# Altium PCB 24V-70A-Power-Board-v2.0.PcbDoc (part 8 of 9)
Units mm, origin at the board's own origin, x right, y up, seen from the top; angles counter-clockwise.
Board outline 350 x 215 mm, 2 copper layers (Top Layer, Bottom Layer), stack 1.64 mm thick; 337 components, 182 nets, 856 pads, 561 vias.
Unrouted connection lines stored in the file: 58.
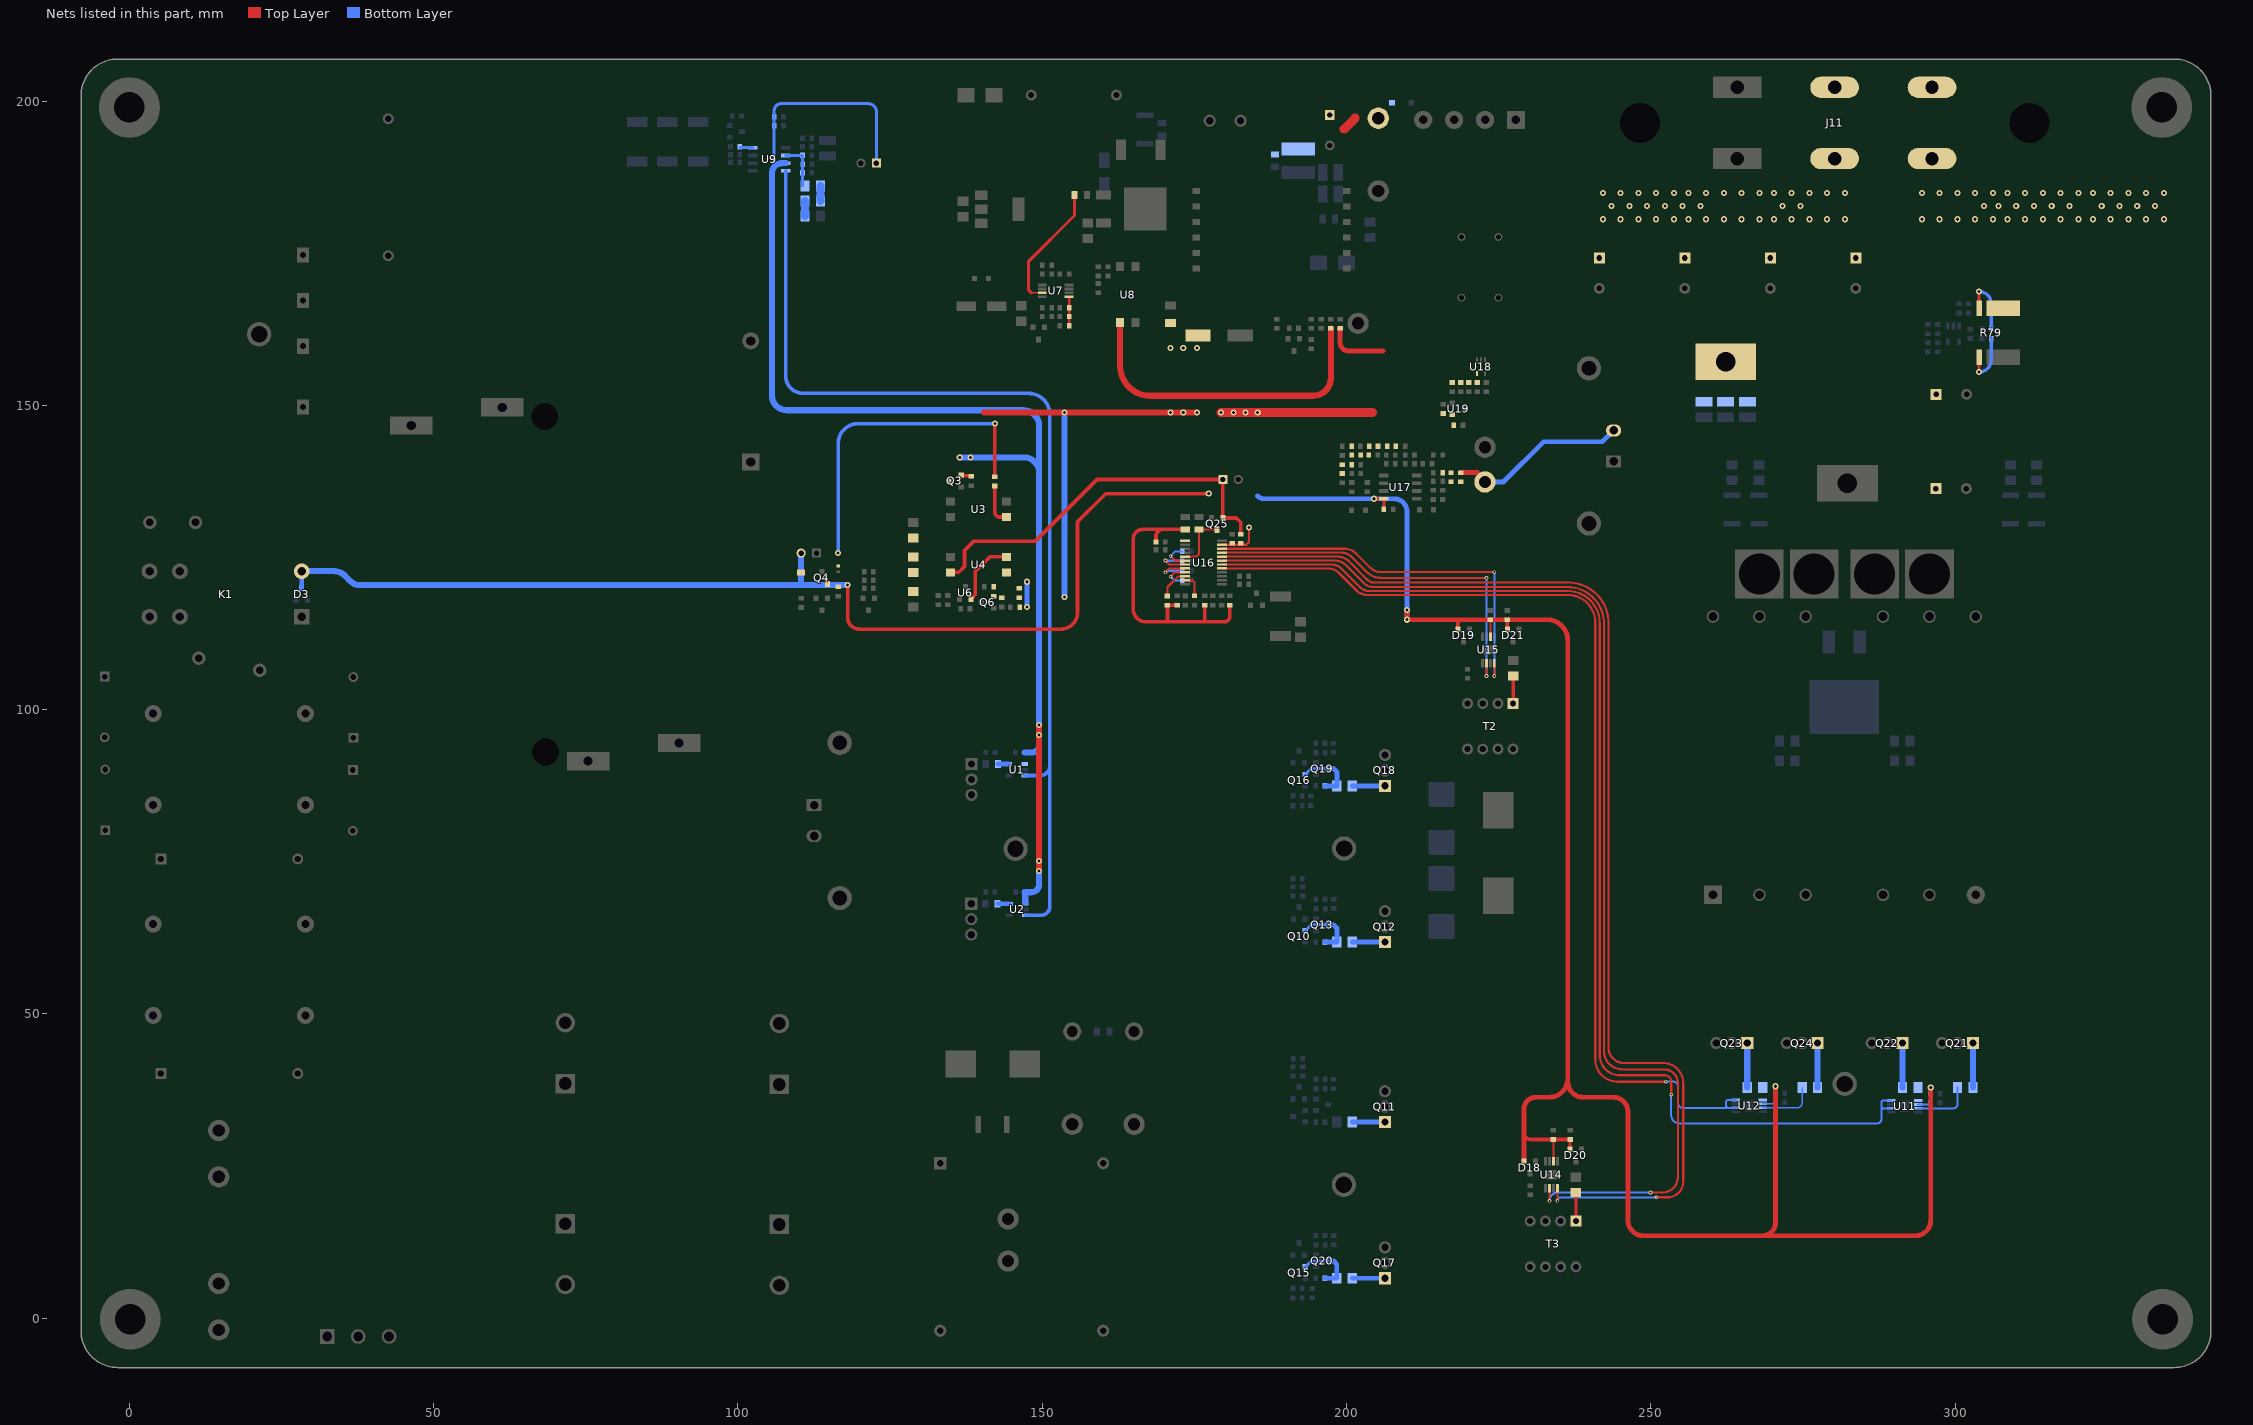
[diagram p3: the nets of this part, all layers, seen from the top]

## Via types
v1: diameter 1, hole 0.5, Top Layer to Bottom Layer, 506 vias
v2: diameter 0.6, hole 0.3, Top Layer to Bottom Layer, 35 vias
v3: diameter 1, hole 0.5, Top Layer to Bottom Layer, tented both sides, 16 vias
v4: diameter 0.6, hole 0.3, Top Layer to Bottom Layer, tented both sides, 4 vias

## Nets (pads, with @x,y where several pads share a name; then routed paths per layer and width w, separated by ;. In a path a pad name is that pad's centre, name@x,y a point inside that pad or via, vN(x,y) a via of type N, cw(c..) or ccw(c..) an arc to the next point about the centre after c; other vN are vias at no path point) (continued)
NetQ10_1: Q10.1 Q13.3 R52.2 R53.1 | length 10.1
  Bottom Layer w0.5: Q10.1@193.218,63.719 193.268,63.719 194.218,64.669 Q13.3@196.996,64.669
  Bottom Layer w0.8: R52.2@196.481,61.819 R53.1@198.425,61.819 198.425,64.11 197.875,64.659 197.006,64.659 Q13.3@196.996,64.669
NetQ11_1: Q11.1 R54.2 | length 5.4
  Bottom Layer w0.8: R54.2@200.951,32.237 Q11.1@206.318,32.237
NetQ12_1: Q12.1 R53.2 | length 5.4
  Bottom Layer w0.8: R53.2@200.965,61.819 Q12.1@206.331,61.819
NetQ15_1: Q15.1 Q20.3 R64.1 R65.2 | length 10.1
  Bottom Layer w0.5: Q15.1@193.204,8.468 193.254,8.468 194.204,9.418 Q20.3@196.982,9.418
  Bottom Layer w0.8: R65.2@196.468,6.568 198.411,6.568 198.411,8.858 197.862,9.408 196.992,9.408 Q20.3@196.982,9.418
NetQ16_1: Q16.1 Q19.3 R62.2 R63.1 | length 10.1
  Bottom Layer w0.5: Q16.1@193.218,89.388 193.268,89.388 194.218,90.338 Q19.3@196.996,90.338
  Bottom Layer w0.8: R62.2@196.481,87.488 R63.1@198.425,87.488 198.425,89.779 197.875,90.328 197.006,90.328 Q19.3@196.996,90.338
NetQ17_1: Q17.1 R64.2 | length 5.4
  Bottom Layer w0.8: R64.2@200.951,6.568 Q17.1@206.318,6.568
NetQ18_1: Q18.1 R63.2 | length 5.4
  Bottom Layer w0.8: R63.2@200.965,87.488 Q18.1@206.331,87.488
NetQ21_1: Q21.1 R73.2 | length 7.3
  Bottom Layer w1.016: R73.2@302.941,37.916 Q21.1@302.941,45.231
NetQ22_1: Q22.1 R75.2 | length 7.3
  Bottom Layer w1.016: R75.2@291.384,37.916 Q22.1@291.384,45.231
NetQ23_1: Q23.1 R76.2 | length 7.3
  Bottom Layer w1.016: R76.2@265.857,37.916 Q23.1@265.857,45.231
NetQ24_1: Q24.1 R74.1 | length 7.3
  Bottom Layer w1.016: R74.1@277.414,37.916 Q24.1@277.414,45.231
NetR1_1: R1.1 U1.5 | length 1.8
  Bottom Layer w0.76: R1.1@142.743,91.088 U1.5@144.515,91.088
NetR2_1: R2.1 U2.5 | length 1.9
  Bottom Layer w0.76: R2.1@142.669,68.126 U2.5@144.617,68.126
NetR10_1: R10.1 R16.1 U4.1 | length 4.2
  Bottom Layer w0.8: v1(147.523,116.871) v1(147.523,121.031)
NetR15_1: R15.1 R18.2
NetR17_1: R17.1 U3.1 | length 6.7
  Top Layer w0.6: R17.1@142.227,136.762 142.227,132.41 ccw(c142.971,132.41) 142.971,131.666 U3.1@144.153,131.666
NetR18_1: R18.1 R20.2
NetR26_2: R26.2 R27.1 | length 2.5
  Bottom Layer w1.27: R27.1@113.563,183.591 R26.2@113.563,186.049
NetR27_2: R27.2 R28.1 | length 2.5
  Bottom Layer w1.27: R28.1@111.023,181.133 R27.2@111.023,183.591
NetR37_1: R37.1 U9.4 | length 2.1
  Bottom Layer w0.508: R37.1@100.311,192.354 U9.4@102.456,192.354
NetR38_1: R38.1 U8.1 | length 54.3
  Top Layer w1: U8.1@162.794,163.603 162.794,156.544 ccw(c167.749,156.544) 167.749,151.589 194.51,151.589 ccw(c194.51,154.513) 197.434,154.513 R38.1@197.434,162.662
NetR41_1: R41.1 U7.7 | length 21.2
  Top Layer w0.3: 148.209,168.504 U7.7@150.023,168.504
  Top Layer w0.5: 148.209,168.504 147.768,168.945 147.768,173.675 155.321,181.228 R41.1@155.321,184.576
NetR56_2: R56.2 T2.1 | length 4.5
  Top Layer w0.6: T2.1@227.392,101.023 R56.2@227.392,105.537
NetR59_2: R59.2 T3.1 | length 4.7
  Top Layer w0.508: T3.1@237.689,15.958 R59.2@237.689,20.65
NetR73_1: R73.1 U11.7 | length 9.6
  Bottom Layer w0.33: U11.7@293.924,34.491 299.751,34.491 ccw(c299.751,35.141) 300.401,35.141 R73.1@300.401,37.916
NetR74_2: R74.2 U12.7 | length 9.5
  Bottom Layer w0.254: U12.7@268.397,34.584 274.043,34.584 ccw(c274.043,35.415) 274.874,35.415 R74.2@274.874,37.916
NetR75_1: R75.1 U11.5
NetR76_1: R76.1 U12.5
NetR78_1: R78.1 R79.1 | length 10
  Top Layer w0.559: R79.1@303.946,165.962 v3@303.946,168.711
  Bottom Layer w0.559: v3(303.944,168.714) cw(c303.944,166.695) 305.962,166.695 R78.1@305.962,162.645
NetR79_3: R79.3 R80.1 | length 9
  Top Layer w0.559: v3(303.949,155.506) R79.3@303.949,157.91
  Bottom Layer w0.559: v3(303.949,155.506) ccw(c303.949,157.522) 305.965,157.522 R80.1@305.965,160.99
NetR90_2: R90.2 R91.1
NetR91_2: R91.2 R92.1
NetR93_2: R93.2 U16.6 | length 4.9
  Top Layer w0.35: v2(171.1,125.226) 171.813,124.513 U16.6@173.491,124.513
  Bottom Layer w0.35: v2(171.1,125.226) 171.886,126.013 R93.2@172.993,126.013
NetR94_2: R94.2 U16.7 | length 6.3
  Top Layer w0.35: v2(170.252,124.513) 170.902,123.863 U16.7@173.491,123.863
  Bottom Layer w0.35: v2(170.252,124.513) 170.294,124.471 172.952,124.471 R94.2@172.993,124.429
NetR95_2: R95.2 U16.8 | length 6.4
  Top Layer w0.35: v2(170.252,122.563) 170.902,123.213 U16.8@173.491,123.213
  Bottom Layer w0.35: v2(170.252,122.563) 170.299,122.563 170.582,122.846 R95.2@173.016,122.846
NetR97_2: R97.2 U16.9 | length 4.8
  Top Layer w0.35: v2(171.104,121.857) 171.81,122.563 U16.9@173.491,122.563
  Bottom Layer w0.35: v2(171.104,121.857) 171.697,121.263 R97.2@173.016,121.263
NetR104_2: R104.2 U16.10 | length 5.1
  Top Layer w0.35: R104.2@170.582,118.697 170.582,120.161 172.333,121.913 U16.10@173.491,121.913
NetR105_2: R105.2 U16.11 | length 3.9
  Top Layer w0.35: U16.11@173.491,121.263 174.686,121.263 175.023,120.925 R105.2@175.023,118.699
NetR106_1: R106.1 R108.2
NetR106_2: R106.2 R107.1
NetR111_2: R111.2 R112.1 R113.1
NetR114_1: R114.1 R119.1 U19.2
NetR116_1: R116.1 R117.2
NetR116_2: R116.2 R118.1
NetU4_2: U4.2 U6.2 | length 11
  Top Layer w0.6: U6.2@138.316,118.185 138.316,118.235 138.426,118.345 138.476,118.345 139.012,118.881 139.012,122.725 141.399,125.113 U4.2@144.153,125.113
OUT-A: U15.4 U16.22 | length 65.3
  Top Layer w0.32: v2(224.303,105.537) U15.4@224.303,107.619
  Top Layer w0.36: U16.22@179.536,126.463 199.731,126.463 cw(c199.731,123.923) 201.527,125.719 203.895,123.351 ccw(c205.691,125.147) 205.691,122.607 v2(224.303,122.607)
  Bottom Layer w0.36: v2(224.303,105.537) v2(224.303,122.607)
OUT-B: U15.2 U16.21 | length 63.1
  Top Layer w0.32: v2(223.003,105.537) U15.2@223.003,107.619
  Top Layer w0.36: U16.21@179.536,125.813 199.104,125.813 cw(c199.104,123.273) 200.9,125.069 203.326,122.643 203.328,122.641 ccw(c205.687,125.001) 205.687,121.664 205.688,121.664 v2(223.003,121.664)
  Bottom Layer w0.36: v2(223.003,105.537) v2(223.003,121.664)
OUT-C: U14.4 U16.20 | length 195.1
  Top Layer w0.32: v2(234.661,19.285) U14.4@234.661,21.368
  Top Layer w0.36: U16.20@179.536,125.163 198.564,125.163 cw(c198.564,122.623) 200.36,124.419 200.931,123.848 202.852,121.927 203.368,121.41 ccw(c204.615,122.657) 204.615,120.894 205.345,120.894 236.443,120.894 cw(c236.443,114.281) 243.056,114.281 243.056,44.475 ccw(c245.596,44.475) 245.596,41.935 252.071,41.935 cw(c252.071,38.676) 255.33,38.676 255.33,22.421 cw(c252.79,22.421) 252.79,19.881 v2(250.915,19.881)
  Bottom Layer w0.32: v2(234.661,19.285) cw(c235.257,19.285) 235.257,19.881 v2(250.915,19.881)
OUT-D: U14.2 U16.19 | length 194
  Top Layer w0.32: v2(233.361,19.285) U14.2@233.361,21.368
  Top Layer w0.36: U16.19@179.536,124.513 198.067,124.513 cw(c198.067,121.973) 198.572,124.462 cw(c198.499,124.109) 198.575,124.461 cw(c197.757,120.674) 198.739,124.422 cw(c198.067,121.973) 199.863,123.769 202.735,120.896 ccw(c204.531,122.693) 204.531,120.153 236.351,120.153 cw(c236.351,114.19) 242.314,114.19 242.314,43.919 ccw(c245.339,43.919) 245.339,40.894 252.206,40.894 cw(c252.206,38.643) 254.457,38.643 254.457,23.216 cw(c251.917,23.216) 251.917,20.676 v2(249.961,20.676)
  Bottom Layer w0.36: v2(233.361,19.285) cw(c234.752,19.285) 234.752,20.676 v2(249.961,20.676)
OUT-E: U11.2 U11.4 U16.18 | length 199.8
  Top Layer w0.36: U16.18@179.536,123.863 197.452,123.863 cw(c197.452,121.323) 199.248,123.119 202.194,120.173 202.195,120.172 ccw(c203.81,121.787) 203.81,119.503 203.812,119.503 236.352,119.503 cw(c236.352,114.236) 241.619,114.236 241.619,43.239 ccw(c244.929,43.239) 244.929,39.929 252.397,39.929 cw(c252.397,38.961) 253.365,38.961 v2(253.365,36.754)
  Bottom Layer w0.33: v2(253.365,36.754) 253.365,33.351 ccw(c254.671,33.351) 254.671,32.045 287.298,32.045 ccw(c287.298,32.644) 287.897,32.644 287.897,35.134 ; U11.2@289.524,34.493 U11.2@289.524,34.491 288.274,34.491 cw(c288.274,34.868) 287.897,34.868 287.897,35.134 ; U11.4@289.524,35.791 288.288,35.791 ccw(c288.288,35.4) 287.897,35.4 287.897,35.134
OUT-F: U12.2 U12.4 U16.17 | length 169.4
  Top Layer w0.36: U16.17@179.536,123.213 196.981,123.213 cw(c196.981,120.673) 198.777,122.469 201.65,119.597 ccw(c203.446,121.393) 203.446,118.853 236.352,118.853 cw(c236.352,114.321) 240.883,114.321 240.883,42.534 ccw(c244.536,42.534) 244.536,38.881 v2(252.476,38.881)
  Bottom Layer w0.33: v2(252.476,38.881) 253.746,38.881 cw(c253.746,38.17) 254.457,38.17 254.457,35.414 ccw(c255.287,35.414) 255.287,34.584 U12.2@263.997,34.584 ; 262.458,34.719 ccw(c262.747,34.961) 262.747,34.584 cw(c262.747,34.961) 262.37,34.961 262.37,35.493 cw(c262.762,35.493) 262.762,35.884 U12.4@263.997,35.884
PFC_GATE_DRV: U1.3 U2.3 U9.8 | length 171.5
  Bottom Layer w0.6: U9.8@107.856,188.544 107.856,154.868 ccw(c110.744,154.868) 110.744,151.98 147.764,151.98 cw(c147.764,148.487) 151.257,148.487 151.257,90.788 ; U1.3@147.115,89.188 149.657,89.188 ccw(c149.657,90.788) 151.257,90.788 ; U2.3@147.217,66.226 149.809,66.226 ccw(c149.809,67.674) 151.257,67.674 151.257,90.788
PFC_ON: NT1.1 R17.2 | length 54.4
  Top Layer w0.6: R17.2@142.227,138.286 v3(142.227,147.012)
  Bottom Layer w0.6: v1(116.478,125.73) 116.478,143.736 cw(c119.754,143.736) 119.754,147.012 v3(142.227,147.012)
PG_PFC: J12.1 Q25.1 R83.1 U4.4 | length 64.1
  Top Layer w0.6: U4.4@134.953,122.573 136.289,122.573 137.243,123.527 137.243,126.168 138.785,127.711 148.89,127.711 159.01,137.83 J12.1@179.688,137.83 Q25.1@179.688,131.527 179.7,131.515 181.895,131.515 182.61,130.801 R83.1@182.61,128.854
QR: C31.2 R33.1 R44.2 U7.1 | length 4.9
  Top Layer w0.4: R44.2@154.32,164.474 R44.2@154.423,164.578 ; R33.1@154.423,163.119 R44.2@154.423,164.578 ; U7.1@154.423,167.781 C31.2@154.423,166.048 R44.2@154.423,164.615 R44.2@154.423,164.578 ; R44.2@154.46,164.615 R44.2@154.423,164.578
SS/EN: C91.2 Q25.3 U16.5 | length 9.5
  Top Layer w0.35: U16.5@173.491,125.163 175.102,125.163 ccw(c175.102,125.813) 175.752,125.813 C91.2@175.752,129.638 178.627,129.638 Q25.3@178.738,129.527
V_out: C58.2 C59.2 C60.2 C61.1 C62.1 C63.1 C64.1 C65.1 C66.1 J11.2 J13.1 L9.2 R68.2 R92.2 | length 28.8
  Top Layer w0.8: R92.2@218.811,138.958 221.506,138.958 222.027,138.437 J13.1@222.758,138.437
  Bottom Layer w0.8: J13.1@222.758,137.421 225.788,137.421 232.398,144.031 242.038,144.031 R68.2@243.897,145.89
  other v1: 242.123,180.598 245.04,180.598 247.956,180.598 250.873,180.598 253.79,180.598 256.173,180.598 259.09,180.598 262.007,180.598 264.923,180.598 267.84,180.598 270.223,180.598 273.14,180.598 276.057,180.598 278.973,180.598 281.89,180.598 243.582,182.753 246.498,182.753 249.415,182.753 252.331,182.753 255.248,182.753 258.165,182.753 271.682,182.753 274.598,182.753 242.123,184.908 245.04,184.908 247.956,184.908 250.873,184.908 253.79,184.908 256.173,184.908 259.09,184.908 262.007,184.908 264.923,184.908 267.84,184.908 270.223,184.908 273.14,184.908 276.057,184.908 278.973,184.908 281.89,184.908
V_out-: J11.3 R79.2
  other v1: 294.55,180.598 297.466,180.598 300.383,180.598 303.299,180.598 306.216,180.598 308.6,180.598 311.516,180.598 314.433,180.598 317.349,180.598 320.266,180.598 322.65,180.598 325.566,180.598 328.483,180.598 331.399,180.598 334.316,180.598 304.758,182.753 307.141,182.753 310.058,182.753 312.974,182.753 315.891,182.753 318.808,182.753 324.108,182.753 327.025,182.753 329.941,182.753 332.858,182.753 294.55,184.908 297.466,184.908 300.383,184.908 303.299,184.908 306.216,184.908 308.6,184.908 311.516,184.908 314.433,184.908 317.349,184.908 320.266,184.908 322.65,184.908 325.566,184.908 328.483,184.908 331.399,184.908 334.316,184.908
VCC_FB: C18.1 C67.2 C68.2 C69.2 C70.2 C80.2 C81.2 C82.2 C83.2 C89.2 C92.2 C99.2 C100.2 C101.2 D3.3 D18.2 D19.2 D20.2 D21.2 D25.1 J6.2 J7.1 K1.6 L5.2 Q4.2 R13.2 R14.2 R29.2 R31.2 R83.2 R115.2 U11.6 U12.6 U14.6 U15.6 U16.23 U17.8 U18.4 | length 554.5
  Top Layer w0.3: U15.6@223.653,112.019 C82.2@223.653,114.789
  Top Layer w0.33: U14.6@234.011,25.768 C81.2@234.011,29.378
  Top Layer w0.35: U16.23@179.536,127.113 183.524,127.113 183.972,127.561 v1(183.972,129.921)
  Top Layer w0.5: v1@204.53,134.671 U17.8@206.139,134.671 ; C92.2@206.152,132.944 U17.8@206.152,134.671
  Top Layer w0.508: D20.2@236.739,27.768 C80.2@236.739,29.378
  Top Layer w0.6: v1(118.035,120.464) 118.034,115.166 ccw(c119.953,115.166) 119.953,113.247 153.073,113.247 ccw(c153.073,115.977) 155.804,115.977 155.804,130.885 160.428,135.509 v1(177.368,135.509) ; D19.2@218.314,113.216 218.314,114.123 cw(c218.979,114.123) 218.979,114.789 ; D21.2@226.442,113.216 C83.2@226.442,114.789 ; 229.176,30.521 ccw(c230.319,30.521) 230.319,29.378 C81.2@234.011,29.378 C80.2@236.739,29.378
  Top Layer w0.8: R31.2@198.958,162.658 198.958,160.337 ccw(c200.342,160.337) 200.342,158.953 206.049,158.953 ; v1(209.931,116.418) v1(209.931,114.789) 218.979,114.789 C82.2@223.653,114.789 C83.2@226.442,114.789 232.98,114.789 cw(c232.98,111.41) 236.359,111.41 236.359,38.862 ccw(c238.899,38.862) 238.899,36.322 243.84,36.322 cw(c243.84,33.909) 246.253,33.909 246.253,16.104 ccw(c248.793,16.104) 248.793,13.564 268.376,13.564 ; D18.2@229.176,25.768 229.176,30.521 229.176,34.383 cw(c231.115,34.383) 231.115,36.322 233.327,36.322 ccw(c233.327,39.354) 236.32,38.868 ; v3(270.502,38.125) 270.487,38.11 270.487,15.674 cw(c268.376,15.674) 268.376,13.564 ; v3(296.014,37.916) 296.014,16.104 cw(c293.474,16.104) 293.474,13.564 268.376,13.564
  Top Layer w1.5: v1(179.4,148.869) v1(181.405,148.869) v1(183.41,148.869) v1(185.414,148.869) 191.821,148.869 196.799,148.869 204.276,148.869 ; 199.634,195.416 201.432,197.214
  Bottom Layer w0.254: U12.6@268.397,35.234 270.374,35.234 ccw(c270.374,35.415) C69.2@270.502,35.287
  Bottom Layer w0.33: U11.6@293.924,35.141 C68.2@295.764,35.141
  Bottom Layer w0.508: C70.2@270.487,36.956 270.495,36.963 270.495,38.118 v3(270.502,38.125) ; C68.2@296.014,35.39 C67.2@296.014,36.863 ; C67.2@296.014,36.863 v3(296.014,37.916)
  Bottom Layer w0.559: C69.2@270.487,35.483 C70.2@270.487,36.956
  Bottom Layer w0.7: D3.3@28.325,119.967 K1.6@28.325,122.721
  Bottom Layer w0.8: 185.395,135.128 ccw(c186.513,136.246) 186.513,134.665 v1(204.524,134.665) 207.829,134.665 cw(c207.829,132.563) 209.931,132.563 v1(209.931,116.418) v1(209.931,114.789)
  Bottom Layer w1: K1.6@28.312,122.764 33.639,122.764 cw(c33.639,120.224) 35.435,122.02 36.322,121.133 ccw(c37.937,122.747) 37.937,120.464 110.373,120.464 ; J6.2@110.373,125.73 110.373,120.464 ; v1(118.035,120.464) 110.373,120.464
VCC_PFC: C34.2 C35.2 C105.2 C106.2 J8.1 Q3.3 U1.1 U2.1 U9.7 | length 225
  Top Layer w1: v3(149.501,73.498) v3(149.501,75.143) v3(149.501,95.842) v3(149.501,97.486)
  Bottom Layer w0.508: 105.954,189.124 105.954,189.193 C34.2@105.954,195.936 C35.2@105.954,197.434 105.954,198.45 cw(c107.097,198.45) 107.097,199.593 121.44,199.593 cw(c121.44,198.272) 122.761,198.272 J8.1@122.761,189.814
  Bottom Layer w1: U9.7@107.856,189.814 107.25,189.814 ccw(c107.25,188.152) 105.954,189.193 ccw(c107.25,188.152) 105.588,188.152 105.588,151.672 ccw(c108.052,151.672) 108.052,149.208 146.901,149.208 cw(c146.901,146.608) 149.501,146.608 149.501,138.938 ; v1(136.449,141.478) v1(138.196,141.478) 146.961,141.478 cw(c146.961,138.938) 149.501,138.938 ; C105.2@147.115,70.006 C105.2@147.217,70.006 148.199,70.006 ccw(c148.199,71.308) 149.501,71.308 v3(149.501,73.498) v3(149.501,75.143) ; C106.2@147.115,92.967 148.285,92.967 ccw(c148.285,94.183) 149.501,94.183 v3(149.501,95.842) v3(149.501,97.486) 149.501,138.938 ; U2.1@147.217,68.34 C105.2@147.217,69.904
VCC_Primary: C12.2 C104.1 D7.1 Q3.2 Q6.2 R9.2 R10.2 R11.2 | length 67.1
  Top Layer w0.6: Q3.2@136.667,138.537 136.77,138.434 138.17,138.434 R11.2@138.318,138.286
  Top Layer w1: 140.437,148.869 v3(153.645,148.869) 171.12,148.869 v1(173.177,148.869) v1(175.457,148.869)
  Bottom Layer w1: v3(153.645,118.516) v3(153.645,148.869)
  other v1: 171.102,148.869 171.102,159.436 173.177,159.436 175.457,159.436
VREF: C88.2 R86.1 R87.2 R88.2 R89.2 R104.1 U16.1 | length 50.7
  Top Layer w0.6: 164.973,116.002 164.973,116.481 ; R86.1@168.69,127.563 168.69,128.472 cw(c169.857,128.472) 169.857,129.639 ; R89.2@172.212,117.178 172.209,117.175 170.585,117.175 R104.1@170.582,117.173 170.582,114.452 ; C88.2@173.491,129.639 169.857,129.639 ; R87.2@176.733,117.178 176.733,114.452 ; R88.2@180.848,117.178 180.848,115.367 cw(c179.934,115.367) 179.934,114.452 176.733,114.452 ; 164.973,116.481 ccw(c167.002,116.481) 167.002,114.452 170.582,114.452 ; 164.973,116.481 164.973,128.082 cw(c166.53,128.082) 166.53,129.639 169.857,129.639 ; 170.582,114.452 176.733,114.452
VSENSE: C27.2 R26.1 R34.1 R39.2 U9.6 | length 7.8
  Bottom Layer w0.508: U9.6@107.856,191.084 R39.2@110.617,191.084 110.617,189.669 ccw(c110.642,189.669) C27.2@110.642,189.644 ccw(c110.642,189.618) 110.617,189.618 R34.1@110.617,188.244 R26.1@110.617,186.049
pads on no net: D3.2 D8.2 D10.2 D23.2 Designator111_1.1 Designator111_1_1.1 Designator111_1_3.1 Designator112.1 Designator112.2 J11.S23 J15.1 J15.3 L1.M1 L2.M1 T1.2 T1.5 T1.8 T1.10 T2.2 T2.3 T3.2 T3.3 T4.2 T4.3 T4.4 T4.5 T4.7 T4.8 T4.9 T4.10 T4.11 T4.12 U11.1 U11.8 U12.1 U12.8 U14.1 U14.8 U15.1 U15.8 U16.16 U18.1 U18.3

## Polygon pours and split planes (outlines as drawn)
GND-S on Top Layer "GND-S_L01_P082" (solid, pour order 82): 219.786,195.178 cw(c218.211,195.178) 218.211,193.603 ccw(c218.211,191.926) 216.535,191.926 216.535,158.704 ccw(c219.075,158.704) 219.075,156.164 224.912,156.164 cw(c224.912,155.423) 225.654,155.423 225.654,153.518 cw(c224.888,153.518) 224.888,152.753 218.431,152.753 ccw(c218.431,152.629) 218.306,152.629 218.306,145.058 cw(c217.615,145.058) 217.615,144.366 212.772,144.366 ccw(c212.772,142.358) 210.764,142.358 210.764,138.181 212.909,138.181 212.909,142.358 cw(c213.833,142.358) 213.833,143.282 219.019,143.282 ccw(c219.019,144.561) 220.298,144.561 cw(c221.432,144.561) 221.432,145.694 232.842,145.694 ccw(c232.842,147.117) 234.264,147.117 234.264,198.679 ccw(c231.724,198.679) 231.724,201.219 221.945,201.219 ccw(c221.945,199.06) 219.786,199.06
GND-S on Top Layer "GND-S_L01_P084" (solid, pour order 84): 196.113,193.531 196.113,182.182 ccw(c198.653,182.182) 198.653,179.642 205.372,179.642 ccw(c205.372,181.391) 207.122,181.391 207.122,185.65 ccw(c205.53,185.65) 205.53,187.242 204.426,187.242 cw(c204.426,189.763) 201.905,189.763 201.905,190.991 ccw(c199.365,190.991) 199.365,193.531
VCC_FB on Top Layer "VCC_FB_L01_P063" (solid, pour order 63): 196.113,194.666 196.113,200.127 cw(c197.002,200.127) 197.002,201.016 206.529,201.016 cw(c206.529,198.476) 209.069,198.476 209.069,197.327 209.069,196.24 ccw(c211.609,196.24) 211.609,193.7 212.725,193.7 cw(c212.725,191.16) 215.265,191.16 215.265,156.362 ccw(c215.734,156.362) 215.734,155.894 221.504,155.894 cw(c221.504,155.313) 222.085,155.313 222.085,153.55 cw(c221.926,153.55) 221.926,153.391 209.144,153.391 ccw(c209.144,150.851) 206.604,150.851 206.604,149.216 cw(c204.064,149.216) 204.064,146.676 179.268,146.676 cw(c179.268,147.636) 178.308,147.636 178.308,148.785 cw(c179.308,148.785) 179.308,149.785 197.981,149.785 ccw(c197.981,152.146) 200.342,152.146 200.342,158.953 cw(c201.714,158.953) 201.714,160.325 204.019,160.325 205.396,160.325 ccw(c205.396,162.865) 207.936,162.865 207.936,186.615 ccw(c205.778,186.615) 205.778,188.773 205.232,188.773 cw(c205.232,190.906) 203.098,190.906 203.098,192.557 ccw(c200.99,192.557) 200.99,194.666
NetC41_2 on Top Layer "NETC41_2_L01_P060" (solid, pour order 60): 302.047,10.465 ccw(c302.082,13.005) 304.622,13.005 304.622,23.063 cw(c307.162,23.063) 307.162,25.603 310.49,25.502 318.262,25.502 ccw(c318.262,28.042) 320.802,28.042 320.802,57.277 ccw(c318.262,57.277) 318.262,59.817 304.038,59.817 cw(c304.038,62.357) 301.498,62.357 301.498,74.676 cw(c304.038,74.676) 304.038,77.216 337.058,77.216 cw(c337.058,74.676) 339.598,74.676 339.573,67.056 339.573,11.532 cw(c337.033,11.532) 337.033,8.992 327.279,8.992 ccw(c327.279,6.452) 324.739,6.452 324.739,-4.293 cw(c322.199,-4.293) 322.199,-6.833 212.889,-6.833 cw(c212.889,-4.293) 210.349,-4.293 210.349,10.274 210.349,12.191 ccw(c209.079,12.191) 209.078,13.462 204.863,13.462 ccw(c204.863,12.992) 204.393,12.992 204.393,10.736 ccw(c204.943,10.736) 204.943,10.185 208.698,10.185 cw(c208.698,9.805) 209.078,9.805 209.078,8.401 cw(c208.552,8.401) 208.552,7.874 207.617,7.874 200.228,7.874 cw(c200.228,9.754) 198.349,9.754 198.349,15.03 cw(c200.889,15.03) 200.889,17.57 201.348,17.57 ccw(c201.348,19.462) 203.241,19.462 203.241,23.542 cw(c205.781,23.542) 205.781,26.082 212.53,26.082 ccw(c212.53,27.724) 214.173,27.724 214.173,30.848 214.173,34.569 ccw(c212.623,34.569) 212.623,36.119 203.73,36.119 cw(c203.73,37.317) 202.532,37.317 202.532,42.951 cw(c203.6,42.951) 203.6,44.018 223.952,44.018 cw(c223.952,41.478) 226.492,41.478 226.492,7.214 ccw(c227.497,7.214) 227.497,6.208 233.119,6.208 ccw(c233.119,6.947) 233.858,6.947 233.858,9.728 cw(c234.594,9.728) 234.594,10.465
GND-S on Top Layer "GND-S_L01_P079" (solid, pour order 79): 322.054,160.477 339.853,160.477 cw(c339.853,159.488) 340.843,159.488 340.843,82.601 cw(c338.303,82.601) 338.303,80.061 336.956,80.061 300.431,80.061 ccw(c300.431,77.521) 297.891,77.521 297.891,60.198 ccw(c300.431,60.198) 300.431,57.658 315.417,57.658 cw(c315.417,55.118) 317.957,55.118 317.957,29.743 cw(c316.713,29.743) 316.713,28.499 300.05,28.499 cw(c300.05,31.039) 297.51,31.039 297.51,38.633 ccw(c296.977,38.633) 296.977,39.167 295.58,39.167 ccw(c295.58,38.405) 294.818,38.405 294.818,34.836 294.818,22.708 cw(c292.278,22.708) 292.278,20.168 274.752,20.168 cw(c274.752,21.996) 272.923,21.996 272.923,35.166 272.923,38.811 ccw(c272.567,38.811) 272.567,39.167 269.748,39.167 ccw(c269.748,38.71) 269.291,38.71 269.291,22.53 cw(c266.751,22.53) 266.751,19.99 258.978,19.99 cw(c258.978,22.109) 256.859,22.109 256.859,55.956 cw(c258.697,55.956) 258.697,57.794 262.153,57.794 ccw(c262.153,60.334) 264.693,60.334 264.693,60.401 264.693,72.873 ccw(c262.153,72.873) 262.153,75.413 246.151,75.413 cw(c246.151,76.86) 244.704,76.86 244.704,98.419 cw(c247.244,98.419) 247.244,100.959 270.06,100.959 cw(c270.179,99.755) 270.18,100.965 305.638,100.965 ccw(c305.638,103.505) 308.178,103.505 308.178,112.192 ccw(c307.238,112.192) 307.238,113.132 302.133,113.132 cw(c302.133,114.503) 300.761,114.503 300.761,152.832 cw(c301.625,152.832) 301.625,153.695 304.597,153.695 ccw(c304.597,154.297) 305.199,154.297 305.199,159.185 cw(c306.491,159.185) 306.491,160.477
NetD17_1 on Top Layer "NETD17_1_L01_P078" (solid, pour order 78): 257.454,112.395 ccw(c257.454,111.76) 256.819,111.76 256.819,107.569 ccw(c257.327,107.569) 257.327,107.061 274.701,107.061 ccw(c274.701,107.95) 275.59,107.95 275.59,111.887 ccw(c274.574,111.887) 274.574,112.903 272.856,112.903 cw(c272.856,113.903) 271.856,113.903 271.856,126.301 266.163,126.301 ccw(c266.161,124.466) 266.142,126.301 263.856,126.301 263.856,113.516 cw(c262.734,113.516) 262.734,112.395
NetD17_2 on Top Layer "NETD17_2_L01_P077" (solid, pour order 77): 306.197,112.395 cw(c306.197,111.76) 306.832,111.76 306.832,107.569 cw(c306.324,107.569) 306.324,107.061 288.95,107.061 cw(c288.95,107.95) 288.061,107.95 288.061,111.887 cw(c289.077,111.887) 289.077,112.903 290.796,112.903 ccw(c290.796,113.903) 291.796,113.903 291.796,126.301 297.488,126.301 cw(c297.49,124.466) 297.509,126.301 299.796,126.301 299.796,113.516 ccw(c300.917,113.516) 300.917,112.395
GND on Top Layer "GND_L01_P070" (solid, pour order 70): 223.324,92.886 223.324,97.275 ccw(c222.072,97.275) 222.072,98.527 195.656,98.527 ccw(c195.656,95.987) 193.116,95.987 193.116,88.621 cw(c187.706,88.621) 187.706,83.21 169.188,83.21 ccw(c169.188,81.64) 167.618,81.64 167.618,75.867 ccw(c169.139,75.867) 169.139,74.346 193.065,74.346 ccw(c193.065,76.784) 195.504,76.784 195.504,78.842 cw(c196.698,78.842) 196.698,80.035 198.149,80.035 ccw(c198.149,81.226) 199.339,81.226 199.339,89.321 cw(c201.879,89.321) 201.879,91.861 222.298,91.861 ccw(c222.298,92.886)
GND on Top Layer "GND_L01_P069" (solid, pour order 69): 179.197,100.063 179.197,96.215 cw(c177.349,96.215) 177.349,94.367 167.999,94.367 cw(c167.999,95.748) 166.618,95.748 166.618,98.146 ccw(c165.018,98.146) 165.018,99.746 149.174,99.746 ccw(c149.174,98.679) 148.107,98.679 148.107,48.92 cw(c145.567,48.92) 145.567,46.38 106.451,46.38 cw(c106.451,48.617) 104.215,48.617 104.215,61.623 cw(c106.638,61.623) 106.638,64.046 112.229,64.046 ccw(c112.229,65.954) 114.136,65.954 114.136,69.057 cw(c116.051,69.057) 116.051,70.972 117.292,70.972 cw(c117.292,69.062) 119.202,69.062 119.202,66.353 ccw(c121.547,66.353) 121.547,64.008 139.624,64.008 ccw(c139.624,64.658) 140.274,64.658 140.274,69.472 ccw(c139.156,69.472) 139.156,70.59 138.349,70.59 cw(c138.349,72.292) 136.647,72.292 136.647,85.873 cw(c137.743,85.873) 137.743,86.97 140.081,86.97 ccw(c140.081,87.981) 141.092,87.981 141.092,91.826 ccw(c139.776,91.826) 139.776,93.142 121.54,93.142 ccw(c121.54,92.557) 120.955,92.557 cw(c120.092,92.557) 120.092,91.694 115.684,91.694 cw(c115.684,93.205) 114.173,93.205 114.173,109.957 176.657,109.957 cw(c176.657,107.417) 179.197,107.417 179.197,106.985
V_out on Top Layer "NONET_L-01_P-001" (solid, pour order 27): 299.729,131.708 cw(c298.704,131.708) 298.704,130.683 292.735,130.683 cw(c292.735,131.445) 291.973,131.445 291.973,141.478 ccw(c289.724,141.478) 289.724,143.727 280.111,143.727 271.018,143.727 238.887,143.727 cw(c238.887,146.267) 236.347,146.267 236.347,148.844 cw(c238.887,148.844) 238.887,151.384 243.078,151.384 ccw(c243.078,153.924) 245.618,153.924 245.618,161.341 ccw(c243.078,161.341) 243.078,163.881 240.69,163.881 cw(c240.69,166.421) 238.15,166.421 238.15,183.378 cw(c240.69,183.378) 240.69,185.918 266.852,185.918 ccw(c266.852,188.458) 269.392,188.458 269.392,194.602 269.392,204.318 cw(c271.475,204.318) 271.475,206.4 287.528,206.4 cw(c287.528,203.86) 290.068,203.86 290.068,172.069 ccw(c292.608,172.069) 292.608,169.529 294.862,169.529 297.189,169.529 cw(c297.189,166.989) 299.729,166.989
NetD13_1 on Top Layer "NETD13_1_L01_P062" (solid, pour order 62): 215.163,62.025 215.163,49.759 cw(c212.903,49.759) 212.903,47.498 203.479,47.498 ccw(c203.441,45.631) 201.574,45.669 201.574,37.643 ccw(c203.449,37.643) 203.449,35.768 211.76,35.768 cw(c211.76,34.371) 213.157,34.371 213.157,29.562 cw(c211.967,29.562) 211.967,28.372 165.049,28.372 cw(c165.049,30.912) 162.509,30.912 162.509,39.472 cw(c165.049,39.472) 165.049,42.012 170.942,42.012 ccw(c170.942,44.552) 173.482,44.552 173.482,70.536 cw(c176.022,70.536) 176.022,73.076 192.798,73.076 cw(c192.798,70.536) 195.338,70.536 195.338,67.843 ccw(c197.878,67.843) 197.878,65.303 212.874,65.303 cw(c212.874,63.014) 215.163,63.014
NetC40_2 on Top Layer "NETC40_2_L01_P059" (solid, pour order 59): 200.533,81.564 ccw(c201.246,81.564) 201.246,80.851 cw(c201.246,79.811) 202.286,79.811 202.286,75.057 202.286,68.361 ccw(c204.826,68.361) 204.826,65.821 212.623,65.821 ccw(c212.623,68.361) 215.163,68.361 215.163,74.397 cw(c217.068,74.397) 217.068,76.302 231.242,76.302 231.242,98.4 223.642,98.4 223.642,92.663 cw(c222.241,92.663) 222.241,91.262 210.845,91.262 ccw(c210.845,90.78) 210.363,90.78 210.363,86.945 cw(c209.092,86.945) 209.092,85.674 204.876,85.674 cw(c204.876,86.145) 204.406,86.145 204.406,88.4 cw(c204.956,88.4) 204.956,88.951 208.712,88.951 ccw(c208.712,89.331) 209.092,89.331 209.092,90.735 ccw(c208.565,90.735) 208.565,91.262 206.695,91.262 201.651,91.262 ccw(c201.651,90.145) 200.533,90.145
+390V on Top Layer "+390V_L01_P041" (solid, pour order 41): 116.23,155.626 116.23,162.916 ccw(c114.96,162.916) 114.96,164.186 113.073,164.186 ccw(c113.077,162.894) 111.785,162.89 111.785,160.503 cw(c105.283,160.503) 105.283,154 89.052,154 ccw(c89.052,151.46) 86.512,151.46 86.512,106.705 ccw(c89.052,106.705) 89.052,104.165 95.275,104.165 cw(c95.276,101.626) 97.815,101.625 97.815,95.618 97.815,90.246 92.405,84.836 89.002,84.836 84.963,84.836 ccw(c84.963,82.296) 82.423,82.296 82.423,46.507 cw(c79.883,46.507) 79.883,43.967 75.006,43.967 64.237,43.967 ccw(c64.237,41.427) 61.697,41.427 61.697,12.192 ccw(c64.237,12.192) 64.22,9.652 72.204,9.601 116.103,9.601 cw(c116.104,7.061) 118.643,7.061 ccw(c121.641,7.061) 121.641,4.064 145.999,4.064 ccw(c145.999,6.604) 148.539,6.604 148.539,11.252 ccw(c146.634,11.252) 146.634,13.157 137.617,13.157 cw(c137.617,14.554) 136.22,14.554 136.22,21.92 cw(c137.846,21.92) 137.846,23.546 138.887,23.546 ccw(c138.887,25.806) 141.148,25.806 141.148,41.758 ccw(c138.608,41.758) 138.608,44.298 105.181,44.298 cw(c105.181,46.838) 102.641,46.838 102.641,70.51 102.591,74.6 109.88,81.89 115.075,81.89 ccw(c115.075,84.429) 117.615,84.43 117.615,87.419 ccw(c115.194,87.419) 115.194,89.84 113.716,89.84 cw(c113.716,91.694) 111.862,91.694 111.862,109.957 ccw(c109.322,109.957) 109.322,112.497 108.153,112.497 cw(c108.153,114.859) 105.791,114.859 105.791,144.018 105.791,145.186 cw(c111.023,145.186) 111.023,150.419 113.69,150.419 ccw(c113.69,152.959) 116.23,152.959
GND on Top Layer "GND_L01_P056" (solid, pour order 56): 118.948,150.876 cw(c116.408,150.876) 116.408,148.336 111.963,148.336 ccw(c111.963,145.796) 109.423,145.796 109.423,135.788 ccw(c111.963,135.788) 111.963,133.248 121.488,133.248 136.093,133.248 ccw(c136.093,133.96) 136.804,133.96 136.804,134.874 ccw(c136.093,134.874) 136.093,135.585 134.036,135.585 131.826,135.585 cw(c131.826,138.125) 129.286,138.125 129.286,148.666 cw(c131.039,148.666) 131.039,150.419 136.756,150.419 ccw(c136.756,152.959) 139.296,152.959 139.296,173.937 ccw(c138.54,173.937) 138.54,174.693 135.23,174.693 cw(c135.23,175.404) 134.518,175.404 134.518,185.649 cw(c135.382,185.649) 135.382,186.512 137.363,186.512 ccw(c137.363,188.34) 139.191,188.34 139.191,193.138 ccw(c137.13,193.138) 137.13,195.199 79.063,195.199 ccw(c79.063,193.632) 77.495,193.632 77.495,183.222 ccw(c79.158,183.222) 79.158,181.559 105.316,181.559 cw(c105.316,179.019) 107.856,179.019 107.856,168.471 ccw(c109.677,168.471) 109.677,166.649 116.408,166.649 cw(c116.408,164.109) 118.948,164.109 118.948,163.97
GND on Top Layer "GND_L01_P054" (solid, pour order 54): 188.316,206.223 cw(c188.316,204.495) 190.043,204.495 190.043,168.91 cw(c189.255,168.91) 189.255,168.123 187.731,168.123 ccw(c187.731,167.157) 186.766,167.157 186.766,158.598 cw(c186.258,158.598) 186.258,158.09 180.267,158.09 cw(c180.264,158.547) 179.807,158.547 179.807,172.872 ccw(c178.877,172.873) 179.802,172.965 ccw(c178.868,172.965) 178.868,173.898 167.955,173.898 ccw(c167.955,172.923) 166.98,172.923 166.98,168.453 cw(c165.786,168.453) 165.786,167.259 161.417,167.259 ccw(c161.417,166.205) 160.363,166.205 160.363,153.525 cw(c157.256,153.525) 157.256,150.419 134.899,150.419 cw(c134.899,152.959) 132.359,152.959 132.359,173.863 cw(c133.198,173.863) 133.198,174.701 138.532,174.701 cw(c138.532,173.937) 139.296,173.937 139.296,161.265 ccw(c141.836,161.265) 141.836,158.725 154.94,158.725 ccw(c154.94,159.473) 155.689,159.473 155.689,166.712 cw(c156.46,166.713) 156.46,167.483 157.144,167.483 ccw(c157.144,168.505) 158.166,168.505 cw(c158.547,168.505) 158.547,168.886 159.677,168.886 ccw(c159.677,169.28) 160.071,169.28 160.071,171.475 cw(c160.223,171.475) 160.223,171.628 163.779,171.628 ccw(c163.779,171.907) 164.059,171.907 164.059,175.336 cw(c164.768,175.336) 164.768,176.045 180.236,176.045 ccw(c180.236,176.987) 181.178,176.987 181.178,204.738 cw(c182.663,204.738) 182.663,206.223
VCC_Primary on Top Layer "VCC_PRIMARY_L01_P053" (solid, pour order 53): 178.627,163.638 ccw(c177.902,163.638) 177.902,164.363 169.645,164.363 ccw(c169.645,163.603) 168.885,163.603 168.885,158.877 ccw(c169.672,158.877) 169.672,158.09 177.851,158.09 ccw(c177.851,158.852) 178.613,158.852 178.627,158.852
NetD7_2 on Top Layer "NETD7_2_L01_P052" (solid, pour order 52): 178.627,169.088 178.627,165.673 cw(c177.902,165.673) 177.902,164.948 169.57,164.948 cw(c169.568,165.631) 168.885,165.637 168.885,172.516 cw(c169.749,172.516) 169.749,173.38 177.836,173.38 cw(c177.836,172.59) 178.627,172.59
NetC21_2 on Top Layer "NETC21_2_L01_P050" (solid, pour order 50): 150.362,165.423 ccw(c150.362,165.808) 150.748,165.808 150.748,167.013 150.748,168.079 149.298,168.079 cw(c149.104,168.079) 149.104,167.886 144.765,167.886 cw(c144.765,168.504) 144.146,168.504 144.146,177.164 ccw(c143.485,177.164) 143.485,177.825 cw(c143.485,178.613) 142.697,178.613 142.697,180.002 ccw(c142.017,180.002) 142.017,180.682 137.895,180.682 137.895,181.768 136.117,181.768 136.117,176.354 ccw(c136.728,176.354) 136.728,175.743 139.273,175.743 cw(c139.296,175.135) 139.903,175.158 139.903,167.089 139.903,166.103 ccw(c140.584,166.103) 140.584,165.423
NetQ7_2 on Top Layer "NETQ7_2_L01_P049" (solid, pour order 49): 147.49,178.93 150.02,178.93 ccw(c150.02,179.976) 151.066,179.976 151.066,188.099 cw(c152.146,188.099) 152.146,189.179 162.627,189.179 ccw(c162.627,190.299) 163.747,190.299 163.747,194.393 ccw(c162.712,194.393) 162.712,195.428 145.821,195.428 ccw(c145.821,192.888) 143.281,192.888 143.281,183.896 cw(c142.367,183.896) 142.367,182.982 138.981,182.982 138.981,181.482 142.392,181.482 cw(c142.392,180.593) 143.281,180.593 143.281,179.562 ccw(c143.913,179.562) 143.913,178.93
NetD4_2 on Top Layer "NETD4_2_L01_P048" (solid, pour order 48): 141.53,206.248 ccw(c141.53,205.332) 140.614,205.332 140.614,197.507 ccw(c141.478,197.507) 141.478,196.644 153.304,196.644 ccw(c153.304,197.721) 154.381,197.721 154.381,205.384 ccw(c153.518,205.384) 153.518,206.248
HV_IN on Top Layer "NONET_L-01_P-001" (solid, pour order 21): 30.327,151.409 35.763,151.409 ccw(c35.763,152.806) 37.16,152.806 37.16,176.149 cw(c39.7,176.149) 39.7,178.689 46.056,178.689 55.626,178.689 ccw(c55.626,181.229) 58.166,181.229 58.166,204.368 cw(c60.046,204.368) 60.046,206.248 138.227,206.248 cw(c138.227,205.232) 139.243,205.232 139.243,197.993 cw(c137.893,197.993) 137.893,196.644 78.203,196.644 ccw(c78.203,193.421) 74.981,193.421 74.981,181.229 ccw(c77.521,181.229) 77.521,178.689 79.934,178.689 102.87,178.689 cw(c102.87,176.149) 105.41,176.149 105.41,159.639 cw(c102.87,159.639) 102.87,157.099 80.461,157.099 66.919,157.099 55.669,157.099 ccw(c55.669,154.559) 53.129,154.559 53.129,135.636 cw(c50.589,135.636) 50.589,133.096 38.398,133.096 28.499,133.096 cw(c28.499,135.636) 25.959,135.636 25.959,146.183 25.959,149.136 cw(c28.232,149.136) 28.232,151.409
NetD6_2 on Top Layer "NETD6_2_L01_P046" (solid, pour order 46): 170.764,182.575 ccw(c171.665,182.575) 171.665,181.674 177.939,181.674 cw(c177.939,181.28) 178.333,181.28 178.333,178.994 cw(c177.95,178.994) 177.95,178.61 173.936,178.61 ccw(c173.936,178.156) 173.482,178.156 173.482,177.47 cw(c172.962,177.47) 172.962,176.95 163.283,176.95 cw(c163.283,177.673) 162.56,177.673 162.56,186.715 cw(c163.187,186.715) 163.187,187.342 170.169,187.342 cw(c170.169,186.747) 170.764,186.747
NetC16_2 on Top Layer "NETC16_2_L01_P045" (solid, pour order 45): 179.095,183.972 ccw(c179.095,185.166) 180.289,185.166 180.289,204.572 ccw(c178.6,204.559) 178.587,206.248 158.039,206.248 ccw(c158.039,204.953) 156.743,204.953 156.743,197.836 ccw(c157.907,197.836) 157.907,196.672 167.304,196.672 cw(c167.304,195.33) 168.647,195.33 168.647,189.688 ccw(c169.426,189.688) 169.426,188.909 171.39,188.909 cw(c171.393,188.21) 172.092,188.214 172.092,185.083 ccw(c173.203,185.083) 173.203,183.972
NetD2_2 on Top Layer "NETD2_2_L01_P043" (solid, pour order 43): 110.776,80.248 104.215,73.687 104.215,67.057 113.207,67.057 113.208,67.056 113.208,69.748 cw(c115.748,69.748) 115.748,72.288 117.551,72.288 cw(c117.551,69.748) 120.091,69.748 120.091,67.094 ccw(c122.631,67.094) 122.631,64.554 139.349,64.554 139.349,66.611 135.643,66.611 cw(c135.643,67.279) 134.976,67.279 134.976,85.873 cw(c136.618,85.873) 136.618,87.516 139.374,87.516 139.374,89.573 122.161,89.573 ccw(c122.161,87.033) 119.621,87.033 119.621,83.337 cw(c117.081,83.337) 117.081,80.797 111.379,80.797
NetC39_2 on Top Layer "NETC39_2_L01_P042" (solid, pour order 42): 142.596,42.113 142.596,26.086 ccw(c145.136,26.086) 145.136,23.546 160.727,23.546 ccw(c160.727,25.633) 162.814,25.633 162.814,27.026 ccw(c160.985,27.026) 160.985,28.854 159.436,28.854 cw(c159.436,29.896) 158.394,29.896 158.394,41.493 ccw(c155.854,41.493) 155.854,44.033 144.515,44.033 ccw(c144.515,42.113)
NetBR1_AC1 on Top Layer "NONET_L-01_P-001" (solid, pour order 16): 22.454,166.675 cw(c22.454,163.523) 25.605,163.523 27.602,163.523 cw(c27.602,160.993) 30.133,160.992 30.133,155.425 cw(c27.593,155.425) 27.593,152.885 18.216,152.885 ccw(c18.212,150.345) 15.672,150.345 15.672,138.665 cw(c13.889,138.665) 13.889,136.883 10.959,136.883 7.645,136.883 ccw(c7.645,134.343) 5.105,134.343 5.105,115.269 cw(c3.095,115.269) 3.095,113.259 -5.537,113.259 cw(c-5.54,115.039) -7.32,115.039 -7.32,164.135 cw(c-4.78,164.135) -4.78,166.675
ISENSE_FB on Top Layer "NONET_L-01_P-001" (solid, pour order 38): 15.138,175.555 15.138,196.312 cw(c17.678,196.312) 17.678,198.852 48.155,198.852 cw(c48.155,196.312) 50.695,196.312 50.695,183.769 cw(c48.155,183.769) 48.155,181.229 34.363,181.229 ccw(c34.363,178.689) 31.823,178.689 31.823,175.174 cw(c29.283,175.174) 29.283,172.634 18.059,172.634 cw(c18.059,175.555)
NetC7_1 on Top Layer "NETC7_1_L01_P035" (solid, pour order 35): -7.01,23.089 ccw(c-4.47,23.089) -4.47,20.549 16.866,20.549 ccw(c16.866,23.089) 19.406,23.089 19.406,40.475 19.406,56.667 ccw(c16.866,56.667) 16.866,59.207 -4.47,59.207 ccw(c-4.47,56.667) -7.01,56.667
AC_N on Top Layer "NONET_L-01_P-001" (solid, pour order 11): 55.474,19.157 55.474,56.667 ccw(c52.934,56.667) 52.934,59.207 28.778,59.207 ccw(c28.778,56.667) 26.238,56.667 26.238,26.111 ccw(c28.778,26.111) 28.778,23.571 37.176,23.571 cw(c37.176,21.031) 39.716,21.031 39.716,-5.439 ccw(c41.643,-5.439) 41.643,-7.366 53.594,-7.366 ccw(c53.594,-5.486) 55.474,-5.486 55.474,-3.596
AC_L on Top Layer "NONET_L-01_P-001" (solid, pour order 32): 14.691,18.201 32.258,18.201 cw(c32.258,15.661) 34.798,15.661 34.798,-4.826 cw(c32.258,-4.826) 32.258,-7.366 19.615,-7.366 10.185,-7.366 cw(c10.185,-4.826) 7.645,-4.826 7.645,5.131 ccw(c5.105,5.131) 5.105,7.671 -4.47,7.671 cw(c-4.47,10.211) -7.01,10.211 -7.01,15.661 cw(c-4.47,15.661) -4.47,18.201
V_out- on Top Layer "NONET_L-01_P-001" (solid, pour order 25): 340.843,187.858 ccw(c338.303,187.858) 338.303,190.398 328.066,190.398 cw(c328.066,192.761) 325.704,192.761 325.704,204.241 ccw(c323.52,204.216) 323.494,206.4 298.523,206.4 293.506,206.4 ccw(c293.506,204.495) 291.601,204.495 291.601,191.922 291.601,174.981 ccw(c294.141,174.981) 294.141,172.441 302.659,172.441 cw(c302.659,169.901) 305.199,169.901 305.199,164.338 ccw(c307.739,164.338) 307.739,161.798 308.534,161.798 337.414,161.798 338.303,161.773 ccw(c338.303,164.313) 340.843,164.313
NetL1_2 on Top Layer "NONET_L-01_P-001" (solid, pour order 22): 57.765,151.364 cw(c60.96,151.364) 60.96,154.559 77.851,154.559 cw(c77.851,151.13) 81.28,151.13 81.28,89.916 cw(c78.74,89.916) 78.74,87.376 60.452,87.376 cw(c60.452,90.063) 57.765,90.063
NetC10_1 on Top Layer "NONET_L-01_P-001" (solid, pour order 15): 14.094,135.279 cw(c14.094,133.701) 15.672,133.7 15.672,99.776 cw(c13.509,99.779) 13.506,97.616 -5.542,97.616 cw(c-5.542,99.394) -7.32,99.394 -7.32,110.189 cw(c-5.542,110.189) -5.542,111.967 4.872,111.967 ccw(c4.872,113.872) 6.777,113.872 6.777,133.607 cw(c8.449,133.607) 8.449,135.279
NetC1_2 on Top Layer "NONET_L-01_P-001" (solid, pour order 9): 23.622,86.3 ccw(c23.622,83.76) 21.082,83.76 21.082,65.143 ccw(c23.622,65.143) 23.622,62.603 40.196,62.603 ccw(c40.203,64.686) 42.287,64.686 42.287,83.506 ccw(c39.493,83.506) 39.493,86.3
NetC8_1 on Top Layer "NONET_L-01_P-001" (solid, pour order 2): 11.913,86.3 cw(c11.913,83.125) 15.088,83.125 15.088,65.143 cw(c12.548,65.143) 12.548,62.603 0.864,62.603 -4.903,62.603 cw(c-4.903,64.71) -7.01,64.71 -7.01,83.506 cw(c-4.216,83.506) -4.216,86.3
V_out- on Bottom Layer "V_OUT-_L02_P085" (solid, pour order 85): 340.843,182.3 cw(c338.303,182.3) 338.303,179.76 292.826,179.76 cw(c292.826,181.248) 291.338,181.248 291.338,204.325 cw(c293.566,204.325) 293.566,206.553 323.342,206.553 cw(c323.342,204.165) 325.73,204.165 325.73,192.938 ccw(c328.27,192.938) 328.27,190.398 338.303,190.398 cw(c338.303,187.858) 340.843,187.858
NetBR1_AC2 on Bottom Layer "NETBR1_AC2_L02_P083" (solid, pour order 83): 26.238,107.696 cw(c26.238,110.236) 23.698,110.236 23.698,131.844 cw(c26.237,131.844) 26.237,134.383 cw(c26.416,132.563) 26.416,134.391 ccw(c26.416,136.601) 28.626,136.601 28.626,140.106 ccw(c24.257,140.106) 24.257,144.475 cw(c24.257,147.015) 21.717,147.015 21.717,152.925 cw(c23.681,152.925) 23.681,154.889 ccw(c23.681,157.116) 25.908,157.116 25.908,161.569 cw(c27.121,161.569) 27.121,162.782 30.314,162.782 ccw(c30.314,164.294) 31.826,164.294 31.826,169.926 31.75,169.951 5.537,169.951 ccw(c5.537,167.411) 2.997,167.411 2.997,137.356 ccw(c5.537,137.356) 5.537,134.816 8.998,134.816 10.897,134.816 cw(c10.897,132.276) 13.437,132.276 13.437,100.406 ccw(c15.977,100.406) 15.977,97.866 38.557,97.866 ccw(c38.557,99.339) 40.03,99.339 40.03,105.918 ccw(c38.252,105.918) 38.252,107.696
GND-S on Bottom Layer "GND-S_L02_P080" (solid, remove dead copper, pour order 80): 236.652,188.392 236.652,180.825 ccw(c238.554,180.825) 238.554,178.923 338.303,178.923 cw(c338.303,176.383) 340.843,176.383 340.843,171.316 340.843,168.529 340.843,20.93 340.843,10.908 cw(c338.829,10.908) 338.829,8.894 327.181,8.894 ccw(c327.181,6.452) 324.739,6.452 324.739,-4.543 cw(c322.449,-4.543) 322.449,-6.833 258.039,-6.833 cw(c258.039,-4.293) 255.499,-4.293 255.499,-3.658 255.499,19.507 ccw(c252.959,19.507) 252.959,22.047 229.083,22.047 cw(c229.083,24.587) 226.543,24.587 226.543,39.573 cw(c229.083,39.573) 229.083,42.113 247.32,42.113 cw(c247.32,40.64) 248.793,40.64 248.793,32.182 ccw(c250.596,32.156) 250.571,30.353 288.501,30.353 ccw(c288.501,32.791) 290.939,32.791 290.939,36.451 292.509,36.451 292.509,32.791 305.232,32.791 ccw(c305.232,35.331) 307.772,35.331 307.772,56.236 cw(c309.677,56.236) 309.677,58.141 327,58.141 ccw(c327,60.681) 329.54,60.681 329.54,124.435 ccw(c327,124.435) 327,126.975 321.996,126.975 cw(c321.996,128.575) 320.396,128.575 320.396,132.258 ccw(c317.856,132.258) 317.856,134.798 294.335,134.798 cw(c294.335,136.83) 292.303,136.83 292.303,142.265 ccw(c290.398,142.265) 290.398,144.17 273.71,144.17 ccw(c273.71,142.189) 271.729,142.189 271.729,140.208 cw(c270.535,140.208) 270.535,139.014 261.681,139.014 ccw(c261.681,138.213) 260.88,138.213 260.88,137.973 cw(c258.34,137.973) 258.34,135.433 257.251,135.433 239.903,135.433 ccw(c239.903,127.889) 232.359,127.889 232.359,106.807 cw(c229.819,106.807) 229.819,104.267 195.275,104.267 cw(c195.275,106.502) 193.04,106.502 193.04,109.703 ccw(c190.5,109.703) 190.5,112.243 168.173,112.243 cw(c168.173,114.122) 166.294,114.122 166.294,140.945 176.555,140.945 ccw(c176.555,140.868) 176.479,140.868 176.479,134.001 188.112,134.001 ccw(c188.112,136.541) 190.652,136.541 190.652,162.585 cw(c193.192,162.585) 193.192,165.125 220.65,165.125 ccw(c220.65,166.573) 222.098,166.573 222.098,168.656 ccw(c220.396,168.656) 220.396,170.358 206.68,170.358 cw(c206.68,171.272) 205.765,171.272 205.765,182.55 ccw(c204.963,182.55) 204.963,183.352 197.891,183.352 197.891,189.702 ccw(c196.855,189.702) 196.855,190.739 196.113,190.739 196.113,194.158 214.884,194.158 ccw(c214.884,195.072) 215.798,195.072 215.798,198.298 cw(c218.338,198.298) 218.338,200.838 234.024,200.838 cw(c234.024,198.298) 236.564,198.298 236.652,197.612
NetD17_2 on Bottom Layer "NETD17_2_L02_P075" (solid, pour order 75): 282.733,56.876 282.733,48.748 cw(c281.182,48.748) 281.182,47.198 ccw(c281.559,45.559) 279.878,45.559 279.878,42.931 ccw(c281.559,42.931) 281.559,41.25 288.987,41.25 ccw(c288.987,42.139) 289.876,42.139 289.876,46.173 cw(c290.384,46.173) 290.384,46.681 292.688,46.681 cw(c292.688,46.304) 293.065,46.304 293.065,42.261 ccw(c293.924,42.261) 293.924,41.402 300.671,41.402 ccw(c300.671,42.164) 301.433,42.164 301.433,46.318 cw(c302.073,46.318) 302.073,46.958 305.282,46.958 ccw(c305.282,47.752) 306.075,47.752 306.075,57.279 cw(c308.361,57.279) 308.361,59.565 317.556,59.565 325.425,59.565 ccw(c325.425,62.105) 327.965,62.105 327.965,123.317 ccw(c325.425,123.317) 325.425,125.857 324.1,125.857 320.426,125.857 cw(c320.426,127.254) 319.029,127.254 319.029,132.014 ccw(c317.09,132.014) 317.09,133.953 294.316,133.953 ccw(c294.316,131.413) 291.776,131.413 291.776,117.526 cw(c290.454,117.526) 290.454,116.205 283.596,116.205 ccw(c283.596,115.037) 282.428,115.037 282.428,108.941 ccw(c283.647,108.941) 283.647,107.721 293.303,107.721 cw(c293.303,106.379) 294.645,106.379 294.645,89.535 cw(c292.105,89.535) 292.105,86.995 284.003,86.995 ccw(c284.003,85.725) 282.733,85.725
V_out on Bottom Layer "V_OUT_L02_P074" (solid, pour order 74): 238.15,181.514 ccw(c239.959,181.514) 239.959,179.705 287.54,179.705 ccw(c287.54,182.245) 290.08,182.245 290.08,192.333 290.08,204.098 ccw(c287.778,204.098) 287.778,206.4 271.27,206.4 ccw(c271.27,204.523) 269.392,204.523 269.392,204.318 269.392,188.221 cw(c268.7,188.221) 268.7,187.528 240.69,187.528 ccw(c240.69,184.988) 238.15,184.988
V_out on Bottom Layer "V_OUT_L02_P073" (solid, pour order 73): 267.32,160.204 267.32,149.907 cw(c267.273,149.907) 267.273,149.86 257.367,149.86 ccw(c257.367,148.144) 255.651,148.144 255.651,145.669 cw(c253.561,145.669) 253.561,143.579 240.747,143.579 240.747,147.883 243.078,147.883 ccw(c243.078,150.423) 245.618,150.423 245.618,157.664 cw(c248.158,157.664) 248.158,160.204 267.153,160.204